# Altium PCB NB3000XN.PcbDoc (part 2 of 71)
Units mil, origin at the board's own origin, x right, y up, seen from the top; angles counter-clockwise.
Board outline 9527.56 x 6929.77 mil, 6 copper layers (Top Layer, GND+SHIELD, MidLayer1, MidLayer2, P2 - 3V3+5V0, Bottom Layer), stack 62.375 mil thick; 832 components, 1027 nets, 4655 pads, 4981 vias.
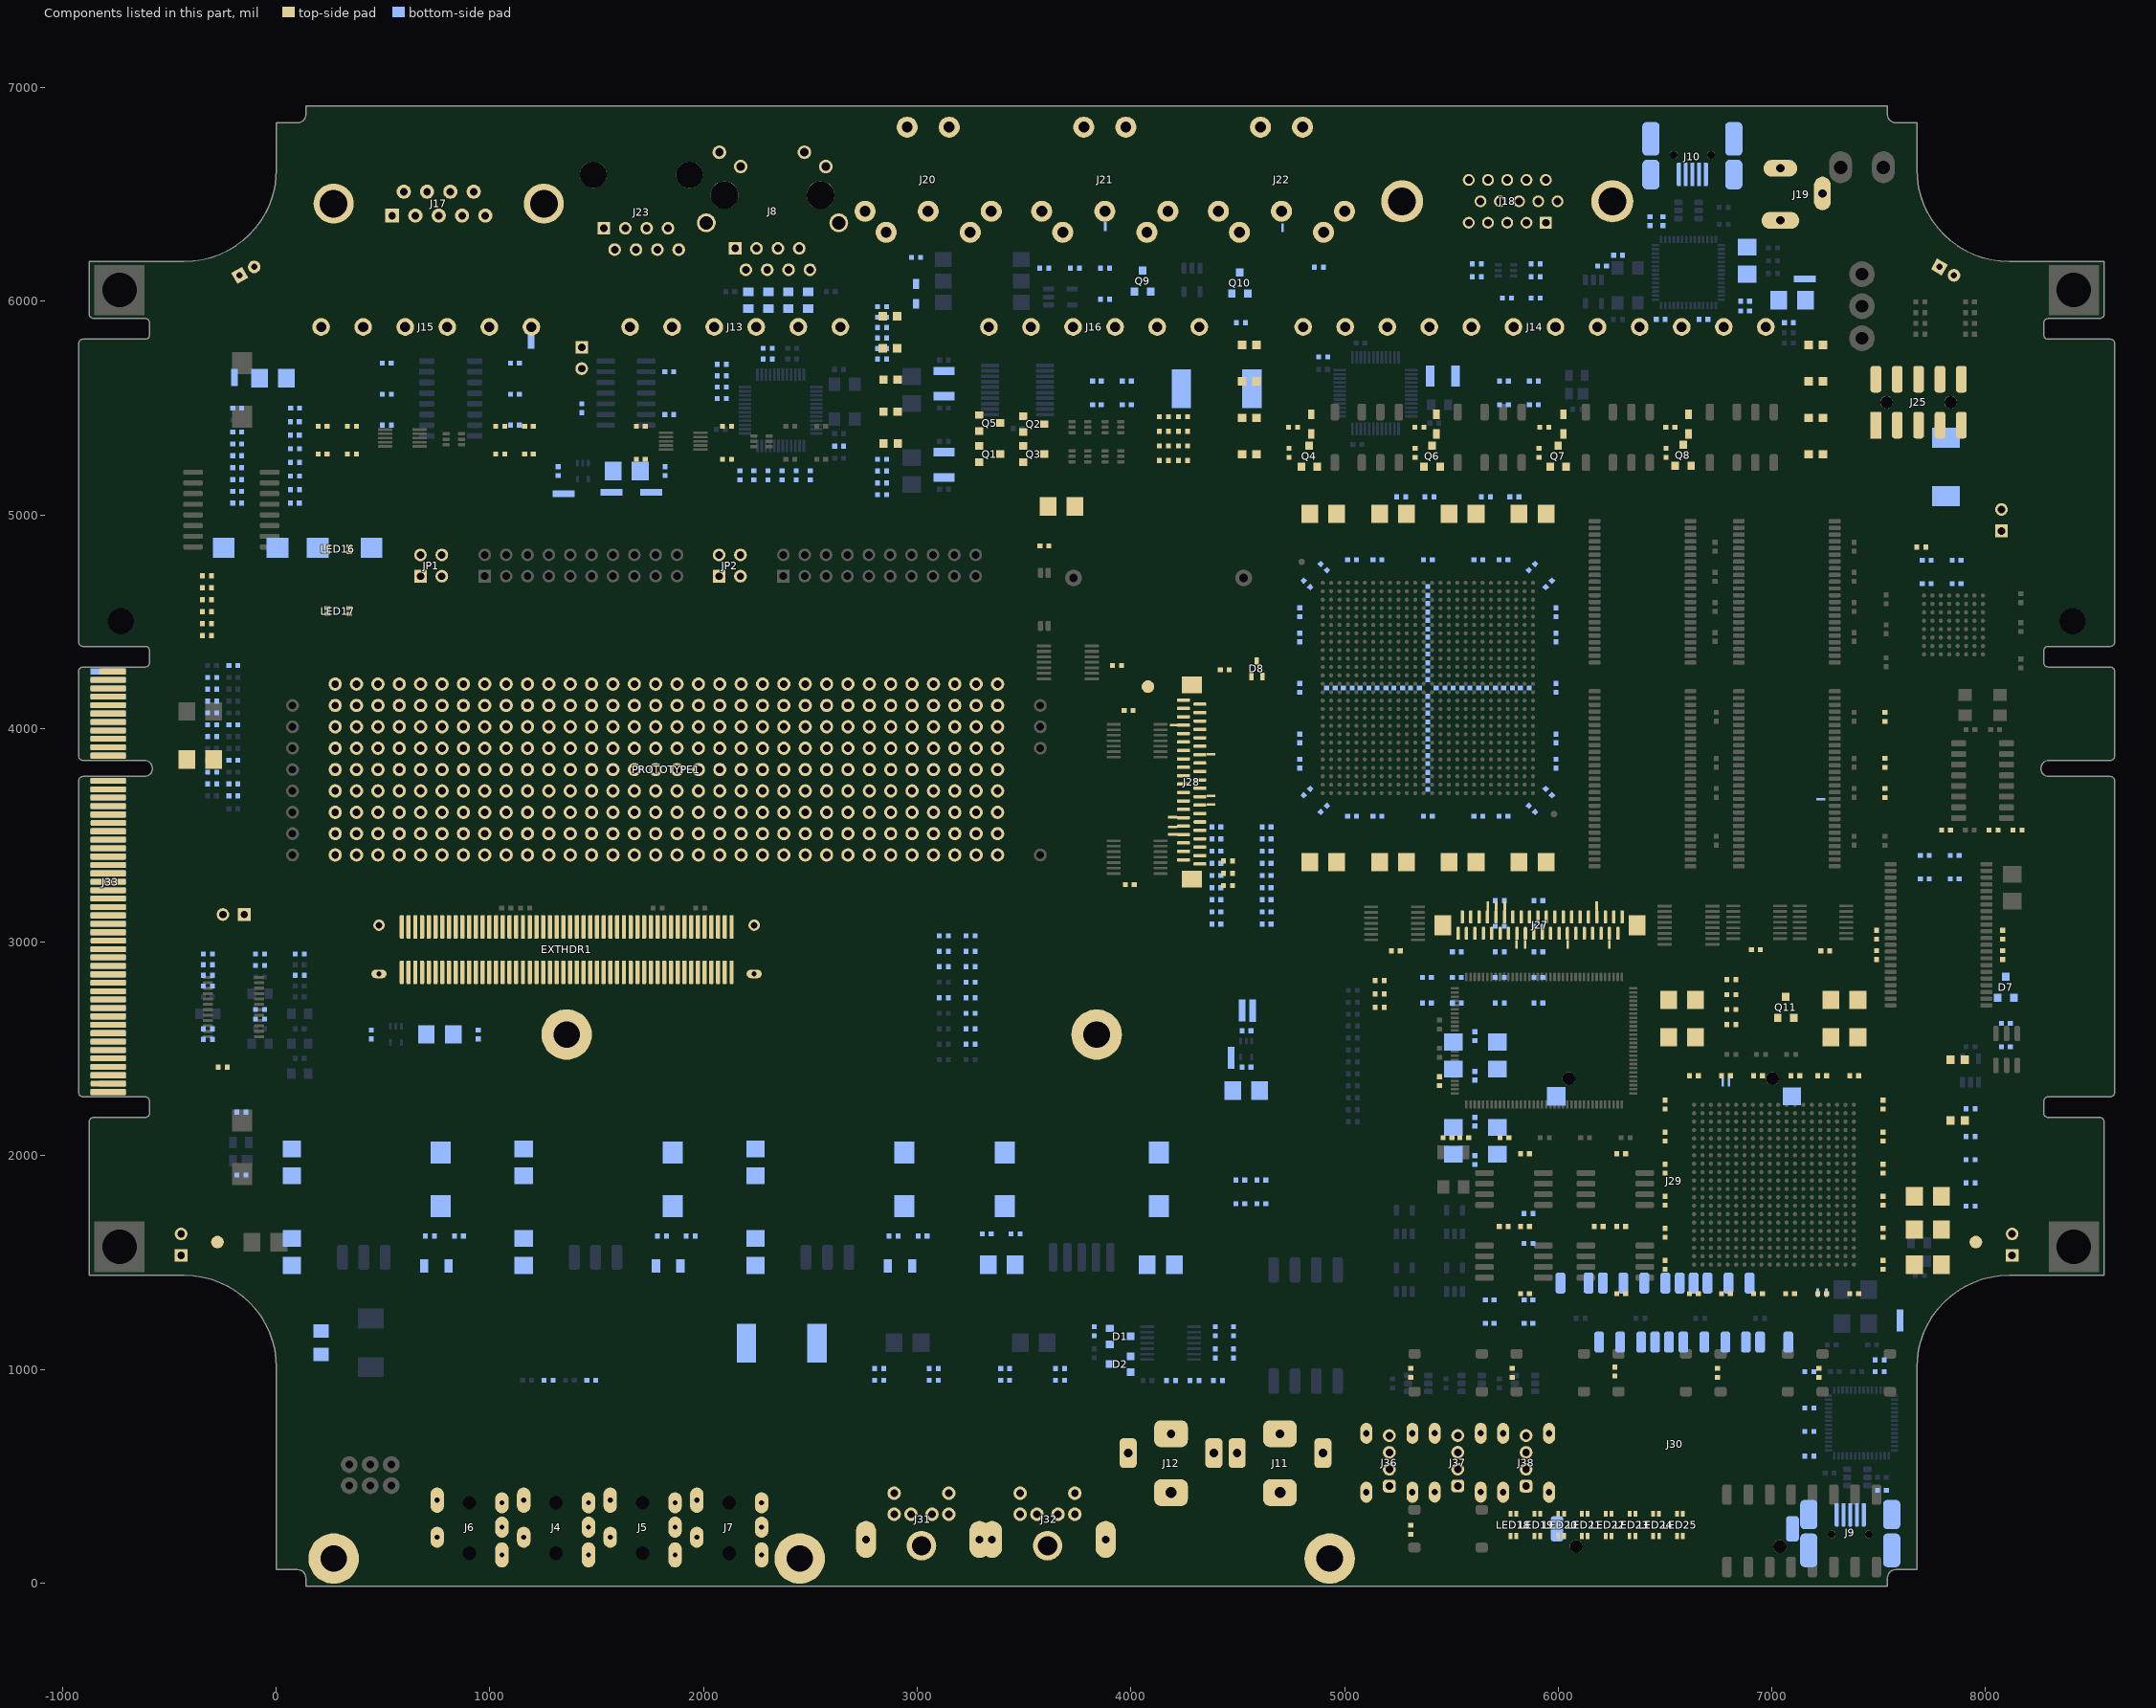
[diagram p6: the components of this part, seen from the top]

## Components (designator, comment, footprint, x,y, rotation, side; value= is the part's Value field where it differs from the comment) (continued)
C106 "220uF 10V" CAPC7343-STAR -120,4845 r180 bottom locked (schematic designator C12)
C107 "220uF 10V" CAPC7343-STAR 320,4845 r180 bottom locked (schematic designator C16)
C108 "1uF 10V" CAPC1005-STAR#1 87.46,5372.94 r180 bottom locked (schematic designator C10)
C109 "1uF 10V" CAPC1005-STAR#1 87.46,5055.08 r0 bottom locked (schematic designator C18)
C110 "1uF 10V" CAPC1005-STAR#1 -182.03,5055.08 r180 bottom locked (schematic designator C14)
C111 "10uF 20V" CAPC3528-STAR#1 -15,5640 r0 bottom locked (schematic designator C23)
C112 "0.1uF 16V" CAPC1005-STAR#1 87.97,5500.08 r180 bottom locked (schematic designator C24)
C113 "0.1uF 16V" CAPC1005-STAR#1 -182.03,5500.08 r180 bottom locked (schematic designator C25)
C114 "0.1uF 16V" CAPC1005-STAR#1 87.46,5436.51 r0 bottom locked (schematic designator C28)
C115 "10uF 20V" CAPC3528-STAR#1 3675,5040 r0 top locked (schematic designator C2)
C116 "0.1uF 16V" CAPC1005-STAR#1 3595,4855 r180 top locked (schematic designator C3)
C117 "33nF 25V" CAPC1005-STAR#1 217,5415 r180 top locked (schematic designator C1)
C118 "33nF 25V" CAPC1005-STAR#1 1183,5415 r0 top locked (schematic designator C2)
C119 "33nF 25V" CAPC1005-STAR#1 1183,5285 r0 top locked (schematic designator C3)
C120 "33nF 25V" CAPC1005-STAR#1 217,5285 r180 top locked (schematic designator C4)
C121 "1uF 10V" CAPC1005-STAR#1 3990,4085 r0 top locked (schematic designator C1)
C122 "1uF 10V" CAPC1005-STAR#1 5240,2960 r0 top locked (schematic designator C1)
C123 "1uF 10V" CAPC1005-STAR#1 6925,2965 r180 top locked (schematic designator C1)
C124 "1uF 10V" CAPC1005-STAR#1 3995,3270 r0 top locked (schematic designator C1)
C125 "1uF 10V" CAPC1005-STAR#1 7250,2960 r0 top locked (schematic designator C1)
C126 "10uF 20V" CAPC3528-STAR#1 2243.07,1550 r90 bottom locked (schematic designator C1)
C127 "1uF 25V" CAPC3216-STAR 2920,1485 r0 bottom locked (schematic designator C2)
C128 "10uF 20V" CAPC3528-STAR#1 2243.07,1970 r90 bottom locked (schematic designator C3)
C129 "220uF 10V" CAPC7343-STAR 2940,1890 r90 bottom locked (schematic designator C4)
C130 "10uF 20V" CAPC3528-STAR#1 1158.07,1550 r90 bottom locked (schematic designator C1)
C131 "1uF 25V" CAPC3216-STAR 1835,1485 r0 bottom locked (schematic designator C2)
C132 "10uF 20V" CAPC3528-STAR#1 1158.07,1970 r90 bottom locked (schematic designator C3)
C133 "220uF 10V" CAPC7343-STAR 1855,1890 r90 bottom locked (schematic designator C4)
C134 "10uF 20V" CAPC3528-STAR#1 73.07,1550 r90 bottom locked (schematic designator C1)
C135 "1uF 25V" CAPC3216-STAR 750,1485 r0 bottom locked (schematic designator C2)
C136 "10uF 20V" CAPC3528-STAR#1 73.07,1970 r90 bottom locked (schematic designator C3)
C137 "220uF 10V" CAPC7343-STAR 770,1890 r90 bottom locked (schematic designator C4)
C138 "220uF 10V" CAPC7343-STAR 4130,1890 r90 bottom locked (schematic designator C1)
C139 "10uF 20V" CAPC3528-STAR#1 4140,1490 r0 bottom locked (schematic designator C2)
C140 "10uF 20V" CAPC3528-STAR#1 3395,1490 r180 bottom locked (schematic designator C3)
C141 "220uF 10V" CAPC7343-STAR 3409.45,1890 r90 bottom locked (schematic designator C4)
C142 "1uF 10V" CAPC1005-STAR#1 4540.98,2585 r180 bottom locked (schematic designator C1)
C143 "10uF 20V" CAPC3528-STAR#1 4540,2305 r0 bottom locked (schematic designator C2)
C144 "1uF 10V" CAPC1005-STAR#1 4540.98,2415 r180 bottom locked (schematic designator C3)
C145 "1uF 10V" CAPC1005-STAR#1 445,2568.37 r270 bottom locked (schematic designator C1)
C146 "10uF 20V" CAPC3528-STAR#2 765.49,2568.37 r180 bottom locked (schematic designator C2)
C147 "1uF 10V" CAPC1005-STAR#1 945,2568.37 r270 bottom locked (schematic designator C3)
C148 "0.1uF 16V" CAPC1005-STAR#1 1117.11,5710.08 r0 bottom locked (schematic designator C1)
C149 "0.1uF 16V" CAPC1005-STAR#1 517.11,5710.08 r0 bottom locked (schematic designator C3)
C150 "0.1uF 16V" CAPC1005-STAR#1 1117.11,5565.08 r0 bottom locked (schematic designator C2)
C151 "0.1uF 16V" CAPC1005-STAR#1 1117.11,5420.08 r0 bottom locked (schematic designator C4)
C152 "1uF 10V" CAPC1005-STAR#1 1840,5470 r0 bottom locked (schematic designator C1)
C153 "0.1uF 16V" CAPC1005-STAR#1 8080,3035 r90 top locked (schematic designator C1_SM)
C154 "0.1uF 16V" CAPC1005-STAR#1 8080,2940 r90 top locked (schematic designator C2_SM)
C155 "10nF 16V" CAPC1005-STAR#1 7490,2940 r90 top locked (schematic designator C3_SM)
C156 "10nF 16V" CAPC1005-STAR#1 7490,3035 r270 top locked (schematic designator C4_SM)
C157 "22pF 50V" CAPC1005-STAR#1 5482,2085 r180 top locked (schematic designator C344)
C158 "10nF 16V" CAPC1005-STAR#1 5745,1670 r0 top locked (schematic designator C1)
C159 "0.1uF 16V" CAPC1005-STAR#1 5845,2010 r180 top locked (schematic designator C2)
C160 "10nF 16V" CAPC1005-STAR#1 6190,1670 r180 top locked (schematic designator C1)
C161 "0.1uF 16V" CAPC1005-STAR#1 6295,1355 r0 top locked (schematic designator C2)
C162 "10nF 16V" CAPC1005-STAR#1 6295,2010 r180 top locked (schematic designator C1)
C163 "0.1uF 16V" CAPC1005-STAR#1 6295,1670 r180 top locked (schematic designator C2)
C164 "10nF 16V" CAPC1005-STAR#1 5845,1670 r180 top locked (schematic designator C3)
C165 "0.1uF 16V" CAPC1005-STAR#1 5845,1355 r180 top locked (schematic designator C4)
C166 "22pF 50V" CAPC1005-STAR#1 6430,6375 r90 bottom locked (schematic designator C1)
C167 "22pF 50V" CAPC1005-STAR#1 6490,6375 r90 bottom locked (schematic designator C2)
C168 "0.1uF 16V" CAPC1005-STAR#1 6280,6215 r180 bottom locked (schematic designator C3)
C169 "22pF 50V" CAPC1005-STAR#1 5560,2085 r180 top locked (schematic designator C345)
C170 "0.1uF 16V" CAPC1005-STAR#1 7080,5900 r180 bottom locked (schematic designator C2)
C171 "10uF 20V" CAPC3528-STAR#1 7095,6005 r0 bottom locked (schematic designator C6)
C172 "0.1uF 16V" CAPC1005-STAR#1 6205,6165 r180 bottom locked (schematic designator C3)
C173 "0.1uF 16V" CAPC1005-STAR#1 6680,5915 r0 bottom locked (schematic designator C4)
C174 "0.1uF 16V" CAPC1005-STAR#1 6480,5915 r180 bottom locked (schematic designator C5)
C175 "10uF 20V" CAPC3528-STAR#1 6885,6190 r90 bottom locked (schematic designator C7)
C176 "0.1uF 16V" CAPC1005-STAR#1 6875,5955 r180 bottom locked (schematic designator C8)
C177 "0.1uF 16V" CAPC1005-STAR#1 6875,6000 r180 bottom locked (schematic designator C9)
C181 "1uF 10V" CAPC1005-STAR#1 1320,5205 r270 bottom locked (schematic designator C1)
C182 "10uF 20V" CAPC3528-STAR#1 1640.49,5205 r180 bottom locked (schematic designator C2)
C183 "1uF 10V" CAPC1005-STAR#1 1820,5205 r270 bottom locked (schematic designator C3)
C184 "10uF 20V" CAPC3528-STAR#1 7340,2730 r0 top locked (schematic designator C42_FP)
C185 "10uF 20V" CAPC3528-STAR#1 5715,2070 r270 bottom locked (schematic designator C343)
C186 "220nF 16V" CAPC1005-STAR#1 5445,2350 r270 top locked (schematic designator C205)
C187 "0.1uF 16V" CAPC1005-STAR#1 5748.74,2085 r0 top locked (schematic designator C204)
C189 "10uF 20V" CAPC3528-STAR#1 6580,2730 r180 top locked (schematic designator C1_FP)
C190 "10uF 20V" CAPC3528-STAR#1 7730,1810 r0 top locked (schematic designator C2_FP)
C191 "10uF 20V" CAPC3528-STAR#1 -355,3855 r180 top locked (schematic designator C3_FP)
C192 "0.1uF 16V" CAPC1005-STAR#1 5386.06,2715 r0 bottom locked (schematic designator C5_FP)
C193 "0.1uF 16V" CAPC1005-STAR#1 5386.06,2835 r0 bottom locked (schematic designator C8_FP)
C194 "0.1uF 16V" CAPC1005-STAR#1 7520,1940 r90 top locked (schematic designator C9_FP)
C195 "0.1uF 16V" CAPC1005-STAR#1 7520,1790 r270 top locked (schematic designator C11_FP)
C196 "10nF 16V" CAPC1005-STAR#1 6935,2375 r180 top locked (schematic designator C13_FP)
C197 "10nF 16V" CAPC1005-STAR#1 7110,2375 r0 top locked (schematic designator C15_FP)
C198 "10nF 16V" CAPC1005-STAR#1 6935,1355 r180 top locked (schematic designator C16_FP)
C199 "10nF 16V" CAPC1005-STAR#1 7085,1355 r0 top locked (schematic designator C18_FP)
C200 "10uF 20V" CAPC3528-STAR#1 7730,1655 r0 top locked (schematic designator C38_FP)
C201 "10uF 20V" CAPC3528-STAR#1 7340,2555 r0 top locked (schematic designator C39_FP)
C202 "10uF 20V" CAPC3528-STAR#1 6580,2555 r180 top locked (schematic designator C40_FP)
C203 "10uF 20V" CAPC3528-STAR#1 7730,1490 r0 top locked (schematic designator C41_FP)
C215 "0.1uF 16V" CAPC1005-STAR#1 6635,2375 r0 top locked (schematic designator C46_FP)
C216 "0.1uF 16V" CAPC1005-STAR#1 4512.39,1776.18 r180 bottom locked (schematic designator C47_FP)
C217 "0.1uF 16V" CAPC1005-STAR#1 7235,2375 r0 top locked (schematic designator C48_FP)
C218 "0.1uF 16V" CAPC1005-STAR#1 7520,2240 r90 top locked (schematic designator C49_FP)
C219 "0.1uF 16V" CAPC1005-STAR#1 5679.72,1326.18 r0 bottom locked (schematic designator C50_FP)
C220 "0.1uF 16V" CAPC1005-STAR#1 7520,1640 r90 top locked (schematic designator C51_FP)
C221 "0.1uF 16V" CAPC1005-STAR#1 6635,1355 r0 top locked (schematic designator C52_FP)
C222 "0.1uF 16V" CAPC1005-STAR#1 7716.06,3296.18 r180 bottom locked (schematic designator C53_FP)
C223 "0.1uF 16V" CAPC1005-STAR#1 7235,1355 r0 top locked (schematic designator C54_FP)
C224 "0.1uF 16V" CAPC1005-STAR#1 6500,2240 r90 top locked (schematic designator C55_FP)
C225 "0.1uF 16V" CAPC1005-STAR#1 5886.06,5626.18 r180 bottom locked (schematic designator C56_FP)
C226 "0.1uF 16V" CAPC1005-STAR#1 5886.06,5516.18 r180 bottom locked (schematic designator C57_FP)
C227 "0.1uF 16V" CAPC1005-STAR#1 7724.33,4788 r180 bottom locked (schematic designator C58_FP)
C228 "0.1uF 16V" CAPC1005-STAR#1 7724.33,4678 r180 bottom locked (schematic designator C59_FP)
C229 "0.1uF 16V" CAPC1005-STAR#1 3981.06,5626.18 r180 bottom locked (schematic designator C60_FP)
C231 "10nF 16V" CAPC1005-STAR#1 6785,2375 r0 top locked (schematic designator C62_FP)
C232 "10nF 16V" CAPC1005-STAR#1 4512.39,1886.18 r180 bottom locked (schematic designator C63_FP)
C233 "10nF 16V" CAPC1005-STAR#1 7385,2375 r0 top locked (schematic designator C64_FP)
C234 "10nF 16V" CAPC1005-STAR#1 7520,2090 r90 top locked (schematic designator C65_FP)
C235 "10nF 16V" CAPC1005-STAR#1 5679.72,1216.18 r0 bottom locked (schematic designator C66_FP)
C236 "10nF 16V" CAPC1005-STAR#1 7520,1490 r90 top locked (schematic designator C67_FP)
C237 "10nF 16V" CAPC1005-STAR#1 6785,1355 r0 top locked (schematic designator C68_FP)
C238 "10nF 16V" CAPC1005-STAR#1 7716.06,3406.18 r180 bottom locked (schematic designator C69_FP)
C239 "10nF 16V" CAPC1005-STAR#1 7385,1355 r0 top locked (schematic designator C70_FP)
C240 "10nF 16V" CAPC1005-STAR#1 6500,2090 r90 top locked (schematic designator C71_FP)
C241 "10nF 16V" CAPC1005-STAR#1 6500,1790 r90 top locked (schematic designator C73_FP)
C242 "10nF 16V" CAPC1005-STAR#1 6500,1490 r90 top locked (schematic designator C74_FP)
C243 "10nF 16V" CAPC1005-STAR#1 3841.06,5626.18 r0 bottom locked (schematic designator C79_FP)
C244 "10nF 16V" CAPC1005-STAR#1 3841.06,5516.18 r0 bottom locked (schematic designator C80_FP)
C245 "10nF 16V" CAPC1005-STAR#1 6500,1940 r90 top locked (schematic designator C81_FP)
C246 "10nF 16V" CAPC1005-STAR#1 6500,1640 r90 top locked (schematic designator C84_FP)
C247 "0.1uF 16V" CAPC1005-STAR#1 7864.33,4788 r0 bottom locked (schematic designator C85_FP)
C248 "10nF 16V" CAPC1005-STAR#1 7864.33,4678 r180 bottom locked (schematic designator C101_FP)
C249 "0.1uF 16V" CAPC1005-STAR#1 5861.06,1326.18 r180 bottom locked (schematic designator C87_FP)
C250 "10nF 16V" CAPC1005-STAR#1 5861.06,1216.18 r180 bottom locked (schematic designator C88_FP)
C251 "10nF 16V" CAPC1005-STAR#1 4611.06,1886.18 r180 bottom locked (schematic designator C89_FP)
C252 "0.1uF 16V" CAPC1005-STAR#1 4611.06,1776.18 r180 bottom locked (schematic designator C100_FP)
C253 "10nF 16V" CAPC1005-STAR#1 7856.06,3406.18 r180 bottom locked (schematic designator C91_FP)
C254 "10nF 16V" CAPC1005-STAR#1 7856.06,3296.18 r180 bottom locked (schematic designator C99_FP)
C255 "0.1uF 16V" CAPC1005-STAR#1 5746.06,5626.18 r180 bottom locked (schematic designator C98_FP)
C256 "10nF 16V" CAPC1005-STAR#1 5746.06,5516.18 r180 bottom locked (schematic designator C94_FP)
C257 "0.1uF 16V" CAPC1005-STAR#1 5526.06,2835 r180 bottom (schematic designator C95_FP)
C258 "10nF 16V" CAPC1005-STAR#1 5526.06,2715 r180 bottom locked (schematic designator C96_FP)
C259 "0.1uF 16V" CAPC1005-STAR#1 3981.06,5516.18 r180 bottom locked (schematic designator C97_FP)
C260 "10uF 20V" CAPC3528-STAR#1 5227.32,5005 r180 top locked (schematic designator C42_FP)
C265 "10uF 20V" CAPC3528-STAR#1 5227.32,3375 r180 top locked (schematic designator C1_FP)
C266 "10uF 20V" CAPC3528-STAR#1 5552.68,3375 r0 top locked (schematic designator C2_FP)
C267 "10uF 20V" CAPC3528-STAR#1 5552.68,5005 r0 top locked (schematic designator C3_FP)
C268 "0.1uF 16V" CAPC1005-STAR#2 5390,4250.04 r90 bottom locked (schematic designator C5_FP)
C269 "0.1uF 16V" CAPC1005-STAR#2 5450.04,4190 r0 bottom locked (schematic designator C8_FP)
C270 "0.1uF 16V" CAPC1005-STAR#2 5390,4129.96 r270 bottom locked (schematic designator C9_FP)
C271 "0.1uF 16V" CAPC1005-STAR#2 5329.96,4190 r180 bottom locked (schematic designator C11_FP)
C272 "10nF 16V" CAPC1005-STAR#2 5390,4328.78 r90 bottom locked (schematic designator C13_FP)
C273 "10nF 16V" CAPC1005-STAR#2 5528.78,4190 r0 bottom locked (schematic designator C15_FP)
C274 "10nF 16V" CAPC1005-STAR#2 5390,4051.22 r270 bottom locked (schematic designator C16_FP)
C275 "10nF 16V" CAPC1005-STAR#2 5251.22,4190 r180 bottom locked (schematic designator C18_FP)
C276 "10uF 20V" CAPC3528-STAR#1 4900,5005 r180 top locked (schematic designator C38_FP)
C277 "10uF 20V" CAPC3528-STAR#1 5880,5005 r0 top locked (schematic designator C39_FP)
C278 "10uF 20V" CAPC3528-STAR#1 4900,3375 r180 top locked (schematic designator C40_FP)
C279 "10uF 20V" CAPC3528-STAR#1 5880,3375 r0 top locked (schematic designator C41_FP)
C291 "0.1uF 16V" CAPC1005-STAR#2 5626.22,4790 r180 bottom locked (schematic designator C46_FP)
C292 "0.1uF 16V" CAPC1005-STAR#2 5153.78,4790 r0 bottom locked (schematic designator C47_FP)
C293 "0.1uF 16V" CAPC1005-STAR#2 5877.06,4755.8 r45 bottom locked (schematic designator C48_FP)
C294 "0.1uF 16V" CAPC1005-STAR#2 4902.94,4755.8 r135 bottom locked (schematic designator C49_FP)
C295 "0.1uF 16V" CAPC1005-STAR#2 5390,4407.52 r90 bottom locked (schematic designator C50_FP)
C296 "0.1uF 16V" CAPC1005-STAR#2 5607.52,4190 r0 bottom locked (schematic designator C51_FP)
C297 "0.1uF 16V" CAPC1005-STAR#2 5390,3972.48 r270 bottom locked (schematic designator C52_FP)
C298 "0.1uF 16V" CAPC1005-STAR#2 5172.48,4190 r180 bottom locked (schematic designator C53_FP)
C299 "0.1uF 16V" CAPC1005-STAR#2 5390,4565 r90 bottom locked (schematic designator C54_FP)
C300 "0.1uF 16V" CAPC1005-STAR#2 5765,4190 r0 bottom locked (schematic designator C55_FP)
C301 "0.1uF 16V" CAPC1005-STAR#2 5390,3815 r270 bottom locked (schematic designator C56_FP)
C302 "0.1uF 16V" CAPC1005-STAR#2 5015,4190 r180 bottom locked (schematic designator C57_FP)
C303 "0.1uF 16V" CAPC1005-STAR#2 5990,4544.33 r90 bottom locked (schematic designator C58_FP)
C304 "0.1uF 16V" CAPC1005-STAR#2 4790,4544.33 r90 bottom locked (schematic designator C59_FP)
C305 "0.1uF 16V" CAPC1005-STAR#2 5990,3953.78 r90 bottom locked (schematic designator C60_FP)
C307 "10nF 16V" CAPC1005-STAR#2 5744.33,4790 r180 bottom locked (schematic designator C62_FP)
C308 "10nF 16V" CAPC1005-STAR#2 5035.67,4790 r0 bottom locked (schematic designator C63_FP)
C309 "10nF 16V" CAPC1005-STAR#2 5955.8,4677.06 r45 bottom locked (schematic designator C64_FP)
C310 "10nF 16V" CAPC1005-STAR#2 4824.2,4677.06 r135 bottom locked (schematic designator C65_FP)
C311 "10nF 16V" CAPC1005-STAR#2 5390,4486.26 r270 bottom locked (schematic designator C66_FP)
C312 "10nF 16V" CAPC1005-STAR#2 5686.26,4190 r180 bottom locked (schematic designator C67_FP)
C313 "10nF 16V" CAPC1005-STAR#2 5390,3893.74 r90 bottom locked (schematic designator C68_FP)
C314 "10nF 16V" CAPC1005-STAR#2 5093.74,4190 r0 bottom locked (schematic designator C69_FP)
C315 "10nF 16V" CAPC1005-STAR#2 5390,4643.74 r270 bottom locked (schematic designator C70_FP)
C316 "10nF 16V" CAPC1005-STAR#2 5843.74,4190 r180 bottom locked (schematic designator C71_FP)
C317 "10nF 16V" CAPC1005-STAR#2 5390,3736.26 r90 bottom locked (schematic designator C73_FP)
C318 "10nF 16V" CAPC1005-STAR#2 4936.26,4190 r0 bottom locked (schematic designator C74_FP)
C319 "10nF 16V" CAPC1005-STAR#2 5990,4426.22 r90 bottom locked (schematic designator C79_FP)
C320 "10nF 16V" CAPC1005-STAR#2 4790,4426.22 r270 bottom locked (schematic designator C80_FP)
C321 "10nF 16V" CAPC1005-STAR#2 5990,3835.67 r270 bottom locked (schematic designator C81_FP)
C322 "10nF 16V" CAPC1005-STAR#2 4790,3835.67 r270 bottom locked (schematic designator C84_FP)
C323 "0.1uF 16V" CAPC1005-STAR#2 4790,3953.78 r90 bottom locked (schematic designator C85_FP)
C324 "10nF 16V" CAPC1005-STAR#2 5877.06,3624.2 r315 bottom locked (schematic designator C101_FP)
C325 "0.1uF 16V" CAPC1005-STAR#2 5955.8,3702.94 r315 bottom locked (schematic designator C87_FP)
C326 "10nF 16V" CAPC1005-STAR#2 4902.94,3624.2 r225 bottom locked (schematic designator C88_FP)
C327 "10nF 16V" CAPC1005-STAR#2 4824.2,3702.94 r225 bottom locked (schematic designator C89_FP)
C328 "0.1uF 16V" CAPC1005-STAR#2 5626.22,3590 r180 bottom locked (schematic designator C100_FP)
C329 "10nF 16V" CAPC1005-STAR#2 5744.33,3590 r180 bottom locked (schematic designator C91_FP)
C330 "10nF 16V" CAPC1005-STAR#2 5153.78,3590 r0 bottom locked (schematic designator C99_FP)
C331 "0.1uF 16V" CAPC1005-STAR#2 5035.67,3590 r0 bottom locked (schematic designator C98_FP)
C332 "10nF 16V" CAPC1005-STAR#2 5390,4790 r0 bottom locked (schematic designator C94_FP)
C333 "0.1uF 16V" CAPC1005-STAR#2 5390,3590 r180 bottom locked (schematic designator C95_FP)
C334 "10nF 16V" CAPC1005-STAR#2 5990,4190 r90 bottom locked (schematic designator C96_FP)
C335 "0.1uF 16V" CAPC1005-STAR#2 4790,4190 r270 bottom locked (schematic designator C97_FP)
C336 "0.1uF 16V" CAPC1005-STAR#1 5610,2560 r90 bottom locked (schematic designator C3)
C337 "0.1uF 16V" CAPC1005-STAR#1 5610,2375 r90 bottom locked (schematic designator C4)
C338 "0.1uF 16V" CAPC1005-STAR#1 5610,2160 r90 bottom locked (schematic designator C5)
C339 "0.1uF 16V" CAPC1005-STAR#1 5610,1980 r90 bottom locked (schematic designator C6)
C340 "10uF 20V" CAPC3528-STAR#1 5510,2470 r270 bottom locked (schematic designator C7)
C341 "10uF 20V" CAPC3528-STAR#1 5510,2070 r270 bottom locked (schematic designator C8)
C342 "10uF 20V" CAPC3528-STAR#1 5715,2470 r270 bottom locked (schematic designator C9)
D1 "200mA 30V" SOT95P230-3C 3950,1155 r90 bottom locked
D2 "200mA 30V" SOT95P230-3C 3950,1025 r270 bottom locked
D3 "ZHCS400" SOD323 4845,5425 r90 top locked (schematic designator D1)
D4 "ZHCS400" SOD323 5430,5425 r90 top locked (schematic designator D1)
D5 "ZHCS400" SOD323 6025,5425 r90 top locked (schematic designator D1)
D6 "ZHCS400" SOD323 6610,5425 r90 top locked (schematic designator D1)
D7 "3.3V" SOT95P230-3D 8095,2789 r180 bottom locked (schematic designator D1)
D8 "BAT54CW-3" SOT323-3AL 4590,4280 r90 top locked (schematic designator D1)
D9 "ZHCS400" SOD323 2995,6035 r270 bottom locked (schematic designator D1)
D10 "5V 5W" DIOM8059 7814.9,5225 r90 bottom locked
EXTHDR1 "NANOCONNECT" 53751 1359.67,2965.55 r180 top locked (schematic designator EXTHDR)
F1 "MF-SM250" MF_SM250 4475,5585 r180 bottom locked
F2 "MF-SM250" MF_SM250 2440,1118.58 r180 bottom locked
FD1 "Fiducial - Round" "FIDUCIAL ROUND" -274.99,1596.61 r90 top locked
FD2 "Fiducial - Round" "FIDUCIAL ROUND" 4080,4196.25 r90 top locked
FD3 "Fiducial - Round" "FIDUCIAL ROUND" 7955,1596.61 r90 top locked
J1 "1x2 HEADER MALE" HDR1X2 -445,1535 r90 top locked
J2 "1x2 HEADER MALE" HDR1X2 -150,3130 r180 top locked
J3 "1x2 HEADER MALE" HDR1X2 8125,1535 r90 top locked
J4 "AUDIO BLACK HEADER" TSH-3675 1310,140 r90 bottom locked (schematic designator J1)
J5 "AUDIO GREEN HEADER" TSH-3675 1715,140 r90 bottom locked (schematic designator J3)
J6 "AUDIO BLUE HEADER" TSH-3675 905,140 r90 bottom locked (schematic designator J4)
J7 "AUDIO BLACK HEADER" TSH-3675 2120,140 r90 bottom locked (schematic designator J5)
J8 "RJ45_LEDS" CON_RJ45_RA_LEDS 2323,6497.49 r0 bottom locked (schematic designator J1)
J9 "USB MINI" KME04-USBMU03A01-1 7430,320 r90 bottom locked (schematic designator J1)
J10 "USB MINI" KME04-USBMU03A01-1 6565,6594 r270 bottom locked (schematic designator J1)
J11 "RCA Header" TRC-005 4697.98,699.39 r90 bottom locked (schematic designator J1)
J12 "RCA Header" TRC-005 4187.98,699.39 r90 bottom locked (schematic designator J2)
J13 "KMRJ103-5.0/508 6WAYS" KMRJ103-5-508-6 2148.35,5880 r0 top locked (schematic designator J1)
J14 "KMRJ103-5.0/508 12WAYS" KMRJ103-5-508-12 5889.2,5880 r0 top locked (schematic designator J4)
J15 "KMRJ103-5.0/508 6WAYS" KMRJ103-5-508-6 702.26,5880 r0 top locked (schematic designator J2)
J16 "KMRJ103-5.0/508 6WAYS" KMRJ103-5-508-6 3828.04,5880.01 r0 top locked (schematic designator J3)
J17 "DRB-09P11G1R" DB9_MALE 597,6513 r180 bottom locked (schematic designator J1)
J18 "HDR-15S11G1R" DB15-VGA-FEMALE 5942,6368 r180 bottom locked (schematic designator J1)
J19 "POWERJACK 3 HEADER" KLD-0202 7040,6918 r270 bottom locked (schematic designator J1)
J20 "KMFCDIN76005" KMFCDIN76005 3051.46,6569 r0 bottom locked (schematic designator J1)
J21 "KMFCDIN76005" KMFCDIN76005 3878.23,6569 r0 bottom locked (schematic designator J2)
J22 "KMFCDIN76005" KMFCDIN76005 4705,6569 r0 bottom locked (schematic designator J3)
J23 "955012881" 955012881 1709,6477 r0 bottom locked (schematic designator J1)
J24 "1x2 HEADER MALE" HDR1X2 8075,4925.76 r90 top locked (schematic designator J1)
J25 "TSM-105-01-S-DV" TSM-105-01-DV 7486.99,5635.25 r0 top locked (schematic designator J1)
J26 "1x2 HEADER MALE" HDR1X2 1429.42,5784.24 r270 top locked (schematic designator J1)
J27 "2x20 FFC VERT" FPC-XXS1VN3R 5915.42,3080 r180 top locked
J28 "2x20 FFC VERT" FPC-XXS1VN3R 4285,3750 r270 top locked (schematic designator J1)
J29 "SD CARD HEADER" KSDC012551#1 6542.3,1883 r180 bottom locked (schematic designator J1)
J30 "SD CARD HEADER" KSDC012551#2 6545.55,650 r0 bottom locked (schematic designator J1)
J31 "MINIDIN 6P" MINIDIN6PURPLE 3020,-10 r90 bottom locked (schematic designator J1)
J32 "MINIDIN 6P" MINIDIN6PURPLE 3610,-10 r90 bottom locked (schematic designator J1)
J33 "Diagnostics Interface" EDGE-PCIE-X8 -923.78,4267.03 r90 top locked (schematic designator J1)
J34 "1x2 PH" PH-2 -171.19,6121.57 r30 bottom (schematic designator J37)
J35 "1x2 PH" PH-2 7784.36,6160.94 r330 bottom (schematic designator J38)
J36 "USB A UPRIGHT" 482040001 5209.9,150 r180 bottom locked (schematic designator J34)
J37 "USB A UPRIGHT" 482040001 5529.9,150.39 r180 bottom locked (schematic designator J34)
J38 "USB A UPRIGHT" 482040001 5849.9,150 r180 bottom locked (schematic designator J34)
JP1 "2x2 HEADER MALE" HDR2X2 675.1,4713.08 r0 top locked
JP2 "2x2 HEADER MALE" HDR2X2 2072.74,4713.08 r0 top locked
L1 "22uH 250mA 0.71R" INDC3225 3125,5235 r270 bottom locked
L2 "22uH 250mA 0.71R" INDC3225 3125,5615 r270 bottom locked
L3 "4.7uH 650mA 0.15R" INDC3225 5460,5650 r180 bottom locked (schematic designator L1)
LED1 "LED, Green, 0603 (1608)" 0603LED_GREEN 7870,2450 r180 top locked
LED2 "LED, 0603, Yellow (1608)" 0603LED_YELLOW 7870,2165 r180 top locked
LED3 "LED, Green, 0603 (1608)" 0603LED_GREEN 2872.68,5779.97 r0 top locked
LED4 "LED, Green, 0603 (1608)" 0603LED_GREEN 2872.74,5930 r0 top locked
LED5 "LED, 0603, Yellow (1608)" 0603LED_YELLOW 2875.55,5633.26 r0 top locked (schematic designator LED2)
LED6 "LED, 0603, Orange (1608)" 0603LED_ORANGE 2875.55,5483.47 r0 top locked
LED7 "0603 LED" 0603LED_RED 2875.6,5333.71 r0 top locked (schematic designator LED3)
LED8 "LED, 0603, Yellow (1608)" 0603LED_YELLOW 4553.95,5624.9 r0 top locked (schematic designator LED1)
LED9 "LED, 0603, Yellow (1608)" 0603LED_YELLOW 4553.95,5454.52 r0 top locked (schematic designator LED1)
LED10 "LED, 0603, Yellow (1608)" 0603LED_YELLOW 4553.95,5284.13 r0 top locked (schematic designator LED1)
LED11 "LED, 0603, Orange (1608)" 0603LED_ORANGE 7205.66,5795.28 r0 top locked (schematic designator LED1)
LED12 "LED, 0603, Yellow (1608)" 0603LED_YELLOW 4553.95,5795.29 r0 top locked (schematic designator LED1)
LED13 "LED, 0603, Orange (1608)" 0603LED_ORANGE 7205.66,5624.9 r0 top locked (schematic designator LED1)
LED14 "LED, 0603, Orange (1608)" 0603LED_ORANGE 7205.66,5454.51 r0 top locked (schematic designator LED1)
LED15 "LED, 0603, Orange (1608)" 0603LED_ORANGE 7205.66,5284.12 r0 top locked (schematic designator LED1)
LED16 "S1204RGBSDJC" S1204RGBSDJC 290.31,4840 r180 top locked (schematic designator LED1)
LED17 "S1204RGBSDJC" S1204RGBSDJC 290.31,4550 r180 top locked (schematic designator LED2)
LED18 "S1204RGBSDJC" S1204RGBSDJC 5790.95,272.51 r90 top locked (schematic designator LED1)
LED19 "S1204RGBSDJC" S1204RGBSDJC 5902.2,272.51 r90 top locked (schematic designator LED2)
LED20 "S1204RGBSDJC" S1204RGBSDJC 6013.45,272.51 r90 top locked (schematic designator LED1)
LED21 "S1204RGBSDJC" S1204RGBSDJC 6124.7,272.51 r90 top locked (schematic designator LED2)
LED22 "S1204RGBSDJC" S1204RGBSDJC 6235.94,272.51 r90 top locked (schematic designator LED1)
LED23 "S1204RGBSDJC" S1204RGBSDJC 6347.19,272.51 r90 top locked (schematic designator LED2)
LED24 "S1204RGBSDJC" S1204RGBSDJC 6458.44,272.51 r90 top locked (schematic designator LED1)
LED25 "S1204RGBSDJC" S1204RGBSDJC 6569.68,272.51 r90 top locked (schematic designator LED2)
LOGO1 "Nanoboard Logo" "NANOBOARD LOGO" 720,4460 r180 bottom locked
NT1 "Net Tie SMT2" NETTIE-SMT2-31X39 -195,5690 r90 bottom locked net-tie
NT4 "Net Tie SMT2" NETTIE-SMT2-8X8#1 7254.76,1322.8 r270 bottom locked net-tie (schematic designator NT2)
NT5 "Net Tie SMT2" NETTIE-SMT2-8X8#2 6770,2380 r90 bottom locked net-tie (schematic designator NT3)
NT6 "Net Tie SMT2" NETTIE-SMT2-8X8#3 7215,1322.8 r270 bottom locked net-tie (schematic designator NT4)
NT7 "Net Tie SMT2" NETTIE-SMT2-8X8#4 6801.11,2380 r90 bottom locked net-tie (schematic designator NT5)
NT10 "Net Tie SMT2" NETTIE-SMT2-31X51 7600,1220 r270 bottom locked net-tie (schematic designator NT1)
NT11 "Net Tie SMT2" NETTIE-SMT2-31X39 1194.15,5771.57 r270 bottom locked net-tie
NT17 "Net Tie SMT2" NETTIE-SMT2-31X51 1745,5105 r180 bottom locked net-tie (schematic designator NT2)
NT18 "Net Tie SMT2" NETTIE-SMT2-31X51 1355,5100 r0 bottom locked net-tie (schematic designator NT1)
NT19 "Net Tie SMT2" NETTIE-SMT2-31X51 1560,5105 r180 bottom locked net-tie (schematic designator NT3)
NT26 "Net Tie SMT2" NETTIE-SMT2-8X8#5 4174.92,3582.44 r180 top locked net-tie (schematic designator NT1)
NT27 "Net Tie SMT2" NETTIE-SMT2-8X8#6 4174.92,3543.07 r180 top locked net-tie (schematic designator NT2)
NT28 "Net Tie SMT2" NETTIE-SMT2-8X8#7 4182,4012 r180 top locked net-tie (schematic designator NT3)
NT29 "Net Tie SMT2" NETTIE-SMT2-8X8#8 4333.78,3877.72 r180 top locked net-tie (schematic designator NT4)
NT30 "Net Tie SMT2" NETTIE-SMT2-8X8#9 4396.06,3641.97 r0 top locked net-tie (schematic designator NT5)
NT31 "Net Tie SMT2" NETTIE-SMT2-8X8#10 4174.92,3503.7 r180 top locked net-tie (schematic designator NT6)
NT33 "Net Tie SMT2" NETTIE-SMT2-8X8#11 4396.06,3681.34 r0 top locked net-tie (schematic designator NT8)
NT34 "Net Tie SMT2" NETTIE-SMT2-8X8#12 6240.46,2970 r270 top locked net-tie
NT35 "Net Tie SMT2" NETTIE-SMT2-8X8#13 5747.86,3190 r90 top locked net-tie
NT36 "Net Tie SMT2" NETTIE-SMT2-8X8#14 5708.49,3190 r90 top locked net-tie
NT37 "Net Tie SMT2" NETTIE-SMT2-8X8#15 5846.76,2970 r270 top locked net-tie
NT38 "Net Tie SMT2" NETTIE-SMT2-8X8#16 6043.61,2970 r270 top locked net-tie
NT39 "Net Tie SMT2" NETTIE-SMT2-8X8#17 6180.93,3190 r90 top locked net-tie
NT40 "Net Tie SMT2" NETTIE-SMT2-8X8#18 5669.12,3190 r90 top locked net-tie
NT41 "Net Tie SMT2" NETTIE-SMT2-8X8#19 5807.39,2970 r270 top locked net-tie
NT42 "Net Tie SMT2" NETTIE-SMT2-31X51 4470,2450 r270 bottom locked net-tie (schematic designator NT10)
NT43 "Net Tie SMT2" NETTIE-SMT2-31X51 4520,2690 r90 bottom locked net-tie (schematic designator NT9)
NT44 "Net Tie SMT2" NETTIE-SMT2-31X51 4570,2670 r270 bottom locked net-tie (schematic designator NT11)
NT45 "Net Tie SMT2" NETTIE-SMT2-31X51 7145,6105 r180 bottom locked net-tie (schematic designator NT1)
NT46 "Net Tie SMT2" NETTIE-SMT2-8X8#20 7259,3669 r0 bottom locked net-tie (schematic designator NT3)
NT47 "Net Tie SMT2" NETTIE-SMT2-8X8#20 3880,6380 r90 bottom locked net-tie
NT48 "Net Tie SMT2" NETTIE-SMT2-8X8#21 4710,6365 r90 bottom locked net-tie
PB_MH1 "8.5mm spacer, Gold, 2xM3" STANDOFF_SOLDER_3MM#1 1359.67,2567.91 r180 top locked
PB_MH2 "8.5mm spacer, Gold, 2xM3" STANDOFF_SOLDER_3MM#2 269.12,115.16 r180 top locked
PB_MH3 "8.5mm spacer, Gold, 2xM3" STANDOFF_SOLDER_3MM#2 2450.22,115.16 r270 top locked
PB_MH4 "8.5mm spacer, Gold, 2xM3" STANDOFF_SOLDER_3MM#2 3839.98,2567.91 r180 top locked
PB_MH5 "8.5mm spacer, Gold, 2xM3" STANDOFF_SOLDER_3MM#2 4930.53,115.16 r270 top locked
PBFREE "" LEAD_FREE_S 4035,4895 r180 bottom
PBOARD_A "Comment" PERIPHERAL_BOARD_1SLOT 2580.16,3213.57 r180 top locked
PBOARD_B "Comment" PERIPHERAL_BOARD_1SLOT 5060.46,3213.58 r180 top locked
PCB1 "NB2STR01 Blank PCB" "NB2STR01 Blank PCB" 1379,1235 r180 bottom
PROTOTYPE1 "" TESTPOINT_ARRAY 276.12,3408.23 r0 top locked (schematic designator PROTOTYPE)
Q1 "AO3400" SOT95P230-3D 3340,5285 r270 top locked
Q2 "AO3400" SOT95P230-3D 3545,5425 r270 top locked (schematic designator Q1)
Q3 "AO3400" SOT95P230-3D 3545,5285 r270 top locked (schematic designator Q1)
Q4 "2N7002" SOT95P230-3D 4835,5275 r0 top locked (schematic designator Q1)
Q5 "AO3400" SOT95P230-3D 3340,5430 r270 top locked (schematic designator Q1)
Q6 "2N7002" SOT95P230-3D 5410,5275 r0 top locked (schematic designator Q1)
Q7 "2N7002" SOT95P230-3D 6000,5275 r0 top locked (schematic designator Q1)
Q8 "2N7002" SOT95P230-3D 6585,5280 r0 top locked (schematic designator Q1)
Q9 "2N7002" SOT95P230-3D 4055,6095 r180 bottom locked (schematic designator Q1)
Q10 "2N7002" SOT95P230-3D 4510,6085 r180 bottom locked (schematic designator Q1)
Q11 "AO3400" SOT95P230-3D 7065,2695 r0 top locked
R1 "3K3 1%" RESC1005-STAR -200,3851.36 r180 bottom locked
R2 "10K 1%" RESC1005-STAR -300,3795.91 r0 bottom locked
R3 "47K 1%" RESC1005-STAR 1475,950 r180 bottom locked (schematic designator R14)
R4 "47K 1%" RESC1005-STAR 1275.01,950 r180 bottom locked (schematic designator R15)
R5 "10K 1%" RESC1005-STAR -300,3740.45 r0 bottom locked (schematic designator R3)
R6 "10K 1%" RESC1005-STAR -200,3740.45 r180 bottom locked (schematic designator R4)
R7 "10K 1%" RESC1005-STAR -200,3685 r180 bottom locked (schematic designator R5)
R8 "22K 1%" RESC1005-STAR -300,3962.27 r180 bottom locked (schematic designator R6)
R9 "100K 1%" RESC1005-STAR -200,4017.73 r180 bottom locked (schematic designator R7)
R10 "10K 1%" RESC1005-STAR -300,4017.73 r180 bottom locked (schematic designator R8)
R11 "10K 1%" RESC1005-STAR -300,4073.18 r180 bottom locked (schematic designator R9)
R12 "10K 1%" RESC1005-STAR -300,4128.64 r180 bottom locked (schematic designator R10)
R13 "10K 1%" RESC1005-STAR -300,4184.09 r180 bottom locked (schematic designator R11)
R14 "3K3 1%" RESC1005-STAR -200,4295 r180 bottom locked (schematic designator R12)
R15 "10K 1%" RESC1005-STAR -300,4239.55 r180 bottom locked (schematic designator R13)
R16 "33R 1%" RESC1005-STAR -320,2795 r180 bottom locked (schematic designator R1)
R17 "33R 1%" RESC1005-STAR -320,2845 r180 bottom locked (schematic designator R2)
R18 "33R 1%" RESC1005-STAR -320,2945 r0 bottom locked (schematic designator R3)
R19 "33R 1%" RESC1005-STAR -320,2545 r180 bottom locked (schematic designator R4)
R20 "33R 1%" RESC1005-STAR -320,2895 r0 bottom locked (schematic designator R5)
R21 "10K 1%" RESC1005-STAR -320,2595 r0 bottom locked (schematic designator R6)
R22 "4K7 1%" RESC1005-STAR -75,2640 r180 bottom locked (schematic designator R7)
R23 "430R 1%" RESC1005-STAR 110,2845 r180 bottom locked (schematic designator R8)
R24 "430R 1%" RESC1005-STAR 110,2945 r180 bottom locked (schematic designator R9)
R25 "4K7 1%" RESC1005-STAR -75,2685 r180 bottom locked (schematic designator R10)
R26 "4K7 1%" RESC1005-STAR -75,2891.25 r180 bottom locked (schematic designator R11)
R27 "4K7 1%" RESC1005-STAR -75,2945 r180 bottom locked (schematic designator R12)
R28 "5R6 1%" RESC1005-STAR 8150,3525 r0 top locked (schematic designator R1)
R29 "5R6 1%" RESC1005-STAR 7815,3525 r180 top locked (schematic designator R2)
R30 "1K 1%" RESC1005-STAR 8038.33,3525 r180 top locked (schematic designator R3)
R31 "120R 1%" RESC1005-STAR 4480,1180 r270 bottom locked (schematic designator R1)
R32 "120R 1%" RESC1005-STAR 4480,1075 r270 bottom locked (schematic designator R2)
R33 "33R 1%" RESC1005-STAR 4407,949 r0 bottom (schematic designator R3)
R34 "75R 1%" RESC1005-STAR 4297.34,949 r180 bottom (schematic designator R4)
R35 "10K 1%" RESC1005-STAR 4395,1180 r270 bottom locked (schematic designator R6)
R36 "75R 1%" RESC1005-STAR 3829,1180 r90 bottom locked (schematic designator R8)
R37 "100R 1%" RESC1005-STAR 4187.68,949 r180 bottom (schematic designator R7)
R38 "10K 1%" RESC1005-STAR 4395,1075 r90 bottom (schematic designator R5)
R39 "270R 1%" RESC1005-STAR 7930,2220 r0 bottom locked (schematic designator R1)
R40 "270R 1%" RESC1005-STAR 7930,2090 r0 bottom locked (schematic designator R2)
R41 "4K7 1%" RESC1005-STAR 2434,5185 r270 bottom locked (schematic designator R1)
R42 "4K7 1%" RESC1005-STAR 2368,5185 r270 bottom locked (schematic designator R2)
R43 "4K7 1%" RESC1005-STAR 2302,5185 r270 bottom locked (schematic designator R3)
R44 "4K7 1%" RESC1005-STAR 2236,5185 r270 bottom locked (schematic designator R4)
R45 "4K7 1%" RESC1005-STAR 2170,5185 r270 bottom locked (schematic designator R5)
R46 "4K7 1%" RESC1005-STAR 2085,5705 r180 bottom locked (schematic designator R6)
R47 "4K7 1%" RESC1005-STAR 2085,5651.67 r180 bottom locked (schematic designator R7)
R48 "49R9 1%" RESC2012-STAR 2303.31,6005 r90 bottom locked (schematic designator R8)
R49 "49R9 1%" RESC2012-STAR 2210,6005 r90 bottom locked (schematic designator R9)
R50 "4K7 1%" RESC1005-STAR 2500,5185 r90 bottom locked (schematic designator R10)
R51 "4K7 1%" RESC1005-STAR 2085,5598.33 r180 bottom locked (schematic designator R11)
R52 "4K7 1%" RESC1005-STAR 2085,5545 r180 bottom locked (schematic designator R12)
R53 "1K 1%" RESC1005-STAR 2300,5730 r0 bottom locked (schematic designator R13)
R54 "49R9 1%" RESC2012-STAR 2396.69,6005 r270 bottom locked (schematic designator R14)
R55 "49R9 1%" RESC2012-STAR 2490,6005 r270 bottom locked (schematic designator R15)
R56 "1K 1%" RESC1005-STAR 2300,5780 r180 bottom locked (schematic designator R16)
R57 "4K7 1%" RESC1005-STAR 2835,5828 r180 bottom locked (schematic designator R17)
R58 "470R 1%" RESC1005-STAR 2835,5877 r0 bottom locked (schematic designator R18)
R59 "4K7 1%" RESC1005-STAR 2635,5322.5 r0 bottom locked (schematic designator R19)
R60 "4K7 1%" RESC1005-STAR 2835,5926 r180 bottom locked (schematic designator R20)
R61 "4K7 1%" RESC1005-STAR 2835,5150 r0 bottom locked (schematic designator R21)
R62 "470R 1%" RESC1005-STAR 2835,5975 r0 bottom locked (schematic designator R22)
R63 "470R 1%" RESC1005-STAR 2835,5095 r0 bottom locked (schematic designator R23)
R64 "4K7 1%" RESC1005-STAR 2835,5730 r0 bottom locked (schematic designator R24)
R65 "4K7 1%" RESC1005-STAR 2835,5205 r0 bottom locked (schematic designator R25)
R66 "470R 1%" RESC1005-STAR 2835,5779 r180 bottom locked (schematic designator R26)
R67 "470R 1%" RESC1005-STAR 2835,5260 r0 bottom locked (schematic designator R27)
R68 "100R 1%" RESC1005-STAR 5727,3195 r180 bottom locked (schematic designator R8)
R69 "100R 1%" RESC1005-STAR 5727,3075 r180 bottom locked (schematic designator R9)
R70 "4K7 1%" RESC1005-STAR 5662.5,5085 r180 bottom locked (schematic designator R1)
R71 "100R 1%" RESC1005-STAR 5727,2955 r180 bottom locked (schematic designator R10)
R72 "100R 1%" RESC1005-STAR 5727,2835 r180 bottom locked (schematic designator R12)
R73 "4K7 1%" RESC1005-STAR 5526.06,2955 r180 bottom (schematic designator R2)
R74 "100R 1%" RESC1005-STAR 5727,2715 r180 bottom locked (schematic designator R24)
R75 "100R 1%" RESC1005-STAR 5907,2715 r180 bottom locked (schematic designator R22)
R76 "4K7 1%" RESC1005-STAR 5397.5,5085 r180 bottom locked (schematic designator R3)
R77 "4K7 1%" RESC1005-STAR 5265,5085 r180 bottom locked (schematic designator R4)
R78 "100R 1%" RESC1005-STAR 5907,3195 r180 bottom locked (schematic designator R20)
R79 "100R 1%" RESC1005-STAR 5907,3075 r180 bottom locked (schematic designator R14)
R80 "100R 1%" RESC1005-STAR 5907,2955 r180 bottom locked (schematic designator R18)
R81 "100R 1%" RESC1005-STAR 5907,2835 r180 bottom locked (schematic designator R23)
R82 "4K7 1%" RESC1005-STAR 2822.05,950 r180 bottom locked (schematic designator R1)
R83 "4K7 1%" RESC1005-STAR 3077.95,950 r180 bottom locked (schematic designator R2)
R84 "100R 1%" RESC1005-STAR 3077.95,1005 r180 bottom locked (schematic designator R3)
R85 "100R 1%" RESC1005-STAR 2822.05,1005 r180 bottom locked (schematic designator R4)
R86 "4K7 1%" RESC1005-STAR 3412.05,950 r180 bottom locked (schematic designator R1)
R87 "4K7 1%" RESC1005-STAR 3667.95,950 r180 bottom locked (schematic designator R2)
R88 "100R 1%" RESC1005-STAR 3667.95,1005 r180 bottom locked (schematic designator R3)
R89 "100R 1%" RESC1005-STAR 3412.05,1005 r180 bottom locked (schematic designator R4)
R90 "27R 1%" RESC1005-STAR 4155,5391.67 r0 top locked (schematic designator R2)
R91 "1K 1%" RESC1005-STAR 4245,5391.67 r0 top locked (schematic designator R1)
R92 "27R 1%" RESC1005-STAR 4155,5323.33 r0 top locked (schematic designator R2)
R93 "1K 1%" RESC1005-STAR 4245,5323.33 r0 top locked (schematic designator R1)
R94 "27R 1%" RESC1005-STAR 4155,5255 r0 top locked (schematic designator R2)
R95 "1K 1%" RESC1005-STAR 4245,5255 r0 top locked (schematic designator R1)
R96 "120R 1%" RESC1005-STAR 4740,5290 r270 top locked (schematic designator R1)
R97 "1K 1%" RESC1005-STAR 4760,5410 r180 top locked (schematic designator R2)
R98 "4K7 1%" RESC1005-STAR -162.5,2205 r0 bottom locked
R99 "2K2 1%" RESC1005-STAR -250,2415 r0 top locked
R100 "5R6 1%" RESC1005-STAR 6810,2825 r0 top locked
R101 "5R6 1%" RESC1005-STAR 6810,2755 r0 top locked
R102 "4K7 1%" RESC1005-STAR 5310,985 r270 top locked (schematic designator R1)
R103 "4K7 1%" RESC1005-STAR 5785,985 r270 top locked (schematic designator R2)
R104 "4K7 1%" RESC1005-STAR 6265,990 r90 top locked (schematic designator R3)
R105 "4K7 1%" RESC1005-STAR 6745,985 r270 top locked (schematic designator R4)
R106 "4K7 1%" RESC1005-STAR 7220,985 r90 top locked (schematic designator R5)
R107 "4K7 1%" RESC1005-STAR 5310,250 r90 top locked (schematic designator R1)
R108 "2K7 1%" RESC1005-STAR 7505,990 r0 bottom locked (schematic designator R2)
R109 "5K6 1%" RESC1005-STAR 7505,1045 r0 bottom locked (schematic designator R3)
R110 "10K 1%" RESC1005-STAR 7515,435 r180 bottom locked (schematic designator R4)
R111 "10M 1%" RESC3216 210,1125 r270 bottom locked (schematic designator R248)
R112 "27R 1%" RESC1005-STAR 7175,595 r0 bottom locked (schematic designator R6)
R113 "4K7 1%" RESC1005-STAR 7175,710 r180 bottom locked (schematic designator R9)
R114 "4K7 1%" RESC1005-STAR 7175,820 r180 bottom locked (schematic designator R8)
R115 "4K7 1%" RESC1005-STAR 7175,990 r180 bottom locked (schematic designator R7)
R116 "430R 1%" RESC1005-STAR 4900,5740 r0 bottom locked (schematic designator R1)
R117 "150R 1%" RESC1005-STAR 5895,6015 r0 bottom locked (schematic designator R2)
R118 "150R 1%" RESC1005-STAR 5760,6015 r0 bottom locked (schematic designator R3)
R119 "150R 1%" RESC1005-STAR 5620,6115 r180 bottom locked (schematic designator R4)
R120 "150R 1%" RESC1005-STAR 5620,6175 r0 bottom locked (schematic designator R5)
R121 "150R 1%" RESC1005-STAR 5895,6175 r180 bottom locked (schematic designator R6)
R122 "150R 1%" RESC1005-STAR 5895,6115 r180 bottom locked (schematic designator R7)
R123 "27R 1%" RESC1005-STAR 4155,5460 r0 top locked (schematic designator R2)
R124 "1K 1%" RESC1005-STAR 4245,5460 r0 top locked (schematic designator R1)
R125 "120R 1%" RESC1005-STAR 5330,5290 r270 top locked (schematic designator R1)
R126 "1K 1%" RESC1005-STAR 5350,5410 r0 top locked (schematic designator R2)
R127 "120R 1%" RESC1005-STAR 5910,5290 r270 top locked (schematic designator R1)
R128 "1K 1%" RESC1005-STAR 5935,5410 r180 top locked (schematic designator R2)
R129 "120R 1%" RESC1005-STAR 6505,5290 r270 top locked (schematic designator R1)
R130 "1K 1%" RESC1005-STAR 6525,5410 r180 top locked (schematic designator R2)
R131 "4K7 1%" RESC1005-STAR 8095,2510 r180 bottom locked (schematic designator R2)
R132 "470R 1%" RESC1005-STAR 8095,2620 r180 bottom locked (schematic designator R1)
R133 "27R 1%" RESC1005-STAR 1705.87,5260 r0 top locked (schematic designator R1)
R134 "27R 1%" RESC1005-STAR 1705.87,5415 r0 top locked (schematic designator R2)
R135 "27R 1%" RESC1005-STAR 2110.87,5415 r180 top locked (schematic designator R3)
R136 "27R 1%" RESC1005-STAR 2110.87,5260 r180 top locked (schematic designator R4)
R137 "10K 1%" RESC1005-STAR -182.03,5388.42 r180 bottom locked (schematic designator R11)
R138 "10K 1%" RESC1005-STAR -182.03,5276.75 r180 bottom locked (schematic designator R18)
R139 "1K 1%" RESC1005-STAR -182.03,5220.92 r0 bottom locked (schematic designator R16)
R140 "1K 1%" RESC1005-STAR -182.03,5110.08 r0 bottom locked (schematic designator R13)
R141 "100K 1%" RESC1005-STAR 87.97,5182.22 r0 bottom locked (schematic designator R10)
R142 "100K 1%" RESC1005-STAR 87.46,5245.8 r180 bottom locked (schematic designator R19)
R143 "1K 1%" RESC1005-STAR 87.46,5118.65 r0 bottom locked (schematic designator R21)
R144 "1K 1%" RESC1005-STAR -182.03,5332.58 r0 bottom locked (schematic designator R26)
R145 "2K2 1%" RESC1005-STAR -182.03,5165.08 r0 bottom locked (schematic designator R25)
R146 "2K2 1%" RESC1005-STAR 87.46,5309.37 r180 bottom locked (schematic designator R27)
R147 "100R 1%" RESC1005-STAR 4440,4275 r0 top locked (schematic designator R1)
R148 "4K7 1%" RESC1005-STAR 3935,4295 r0 top locked (schematic designator R1)
R149 "27R 1%" RESC1005-STAR 355,5415 r0 top locked (schematic designator R1)
R150 "27R 1%" RESC1005-STAR 1048.82,5415 r180 top locked (schematic designator R2)
R151 "27R 1%" RESC1005-STAR 1048.82,5285 r180 top locked (schematic designator R3)
R152 "27R 1%" RESC1005-STAR 355,5285 r0 top locked (schematic designator R4)
R153 "5R6 1%" RESC1005-STAR 5795,5085 r0 bottom locked (schematic designator R1_HOST)
R154 "4K7 1%" RESC1005-STAR -162.5,1910 r180 bottom locked
R155 "2K2 1%" RESC1005-STAR 7530,4055 r270 top locked (schematic designator R272)
R156 "2K2 1%" RESC1005-STAR 7530,3839.49 r270 top locked (schematic designator R273)
R157 "2K2 1%" RESC1005-STAR 7530,3698.78 r270 top locked (schematic designator R274)
R158 "2K2 1%" RESC1005-STAR 5861.06,1730 r0 bottom locked (schematic designator R1)
R159 "2K2 1%" RESC1005-STAR 7700,4850 r180 top locked (schematic designator R2)
R160 "2K2 1%" RESC1005-STAR 5861.06,1590 r0 bottom locked (schematic designator R3)
R161 "4K7 1%" RESC1005-STAR 7930,1873.33 r180 bottom locked (schematic designator R1)
R162 "4K7 1%" RESC1005-STAR 7930,1765 r180 bottom locked (schematic designator R2)
R163 "4K7 1%" RESC1005-STAR 7930,1981.67 r180 bottom locked (schematic designator R3)
R164 "150R 1%" RESC1005-STAR -325,4715 r180 top locked (schematic designator R1)
R165 "150R 1%" RESC1005-STAR -325,4603 r180 top locked (schematic designator R2)
R166 "150R 1%" RESC1005-STAR -325,4659 r180 top locked (schematic designator R3)
R167 "150R 1%" RESC1005-STAR -325,4547 r180 top locked (schematic designator R4)
R168 "150R 1%" RESC1005-STAR -325,4435 r180 top locked (schematic designator R5)
R169 "150R 1%" RESC1005-STAR -325,4491 r180 top locked (schematic designator R6)
R170 "150R 1%" RESC1005-STAR 4455,3380 r180 top locked (schematic designator R1)
R171 "150R 1%" RESC1005-STAR 4455,3265 r180 top locked (schematic designator R2)
R172 "150R 1%" RESC1005-STAR 4455,3322.5 r180 top locked (schematic designator R3)
R173 "150R 1%" RESC1005-STAR 5165,2820 r180 top locked (schematic designator R4)
R174 "150R 1%" RESC1005-STAR 5165,2695 r180 top locked (schematic designator R5)
R175 "150R 1%" RESC1005-STAR 5165,2757.5 r180 top locked (schematic designator R6)
R176 "150R 1%" RESC1005-STAR 4400,3198.75 r0 bottom locked (schematic designator R1)
R177 "150R 1%" RESC1005-STAR 4400,3085 r0 bottom locked (schematic designator R2)
R178 "150R 1%" RESC1005-STAR 4400,3141.88 r0 bottom locked (schematic designator R3)
R179 "150R 1%" RESC1005-STAR 4400,3369.38 r0 bottom locked (schematic designator R4)
R180 "150R 1%" RESC1005-STAR 4400,3255.62 r0 bottom locked (schematic designator R5)
R181 "150R 1%" RESC1005-STAR 4400,3312.5 r0 bottom locked (schematic designator R6)
R182 "150R 1%" RESC1005-STAR 4400,3540 r0 bottom locked (schematic designator R1)
R183 "150R 1%" RESC1005-STAR 4400,3426.25 r0 bottom locked (schematic designator R2)
R184 "150R 1%" RESC1005-STAR 4400,3483.12 r0 bottom locked (schematic designator R3)
R185 "150R 1%" RESC1005-STAR 4635,3198.75 r0 bottom locked (schematic designator R4)
R186 "150R 1%" RESC1005-STAR 4635,3085 r0 bottom locked (schematic designator R5)
R187 "150R 1%" RESC1005-STAR 4635,3141.88 r0 bottom locked (schematic designator R6)
R188 "150R 1%" RESC1005-STAR 4635,3369.38 r0 bottom locked (schematic designator R1)
R189 "150R 1%" RESC1005-STAR 4635,3255.62 r0 bottom locked (schematic designator R2)
R190 "150R 1%" RESC1005-STAR 4635,3312.5 r0 bottom locked (schematic designator R3)
R191 "150R 1%" RESC1005-STAR 4635,3540 r0 bottom locked (schematic designator R4)
R192 "150R 1%" RESC1005-STAR 4635,3426.25 r0 bottom locked (schematic designator R5)
R193 "150R 1%" RESC1005-STAR 4635,3483.12 r0 bottom locked (schematic designator R6)
R194 "220R 1%" RESC1005-STAR 2995,6205 r0 bottom locked (schematic designator R2)
R195 "470R 1%" RESC1005-STAR 3737.5,6155 r0 bottom locked (schematic designator R1)
R196 "27R 1%" RESC1005-STAR 3595,6155 r180 bottom locked (schematic designator R3)
R197 "220R 1%" RESC1005-STAR 3880,6155 r0 bottom locked (schematic designator R5)
R198 "120R 1%" RESC1005-STAR 3880,6010 r0 bottom locked (schematic designator R4)
R199 "220R 1%" RESC1005-STAR 4880,6160 r0 bottom locked (schematic designator R7)
R200 "120R 1%" RESC1005-STAR 4515,5900 r0 bottom locked (schematic designator R6)
R201 "120R 1%" RESC1005-STAR 2890,1625 r180 bottom locked (schematic designator R1)
R202 "56R 1%" RESC1005-STAR 3025,1625 r0 bottom locked (schematic designator R2)
R203 "120R 1%" RESC1005-STAR 1805,1625 r180 bottom locked (schematic designator R1)
R204 "120R 1%" RESC1005-STAR 1940,1625 r0 bottom locked (schematic designator R2)
R205 "120R 1%" RESC1005-STAR 720,1625 r180 bottom locked (schematic designator R1)
R206 "200R 1%" RESC1005-STAR 855,1625 r0 bottom locked (schematic designator R2)
R207 "0R 5%" RESC1005-STAR 3325,1635 r180 bottom locked (schematic designator R1)
R208 "10K 1%" RESC1005-STAR 3460,1635 r0 bottom locked (schematic designator R2)
R209 "100R 1%" RESC1005-STAR 517.11,5565.08 r0 bottom locked (schematic designator R1)
R210 "100R 1%" RESC1005-STAR 517.11,5420.08 r0 bottom locked (schematic designator R2)
R211 "100R 1%" RESC1005-STAR 1840,5670 r180 bottom locked (schematic designator R1)
R212 "120R 1%" RESC1005-STAR 1430,5500 r90 bottom locked (schematic designator R2)
R214 "120R 1%" RESC1005-STAR 6810,2615 r0 top locked
R215 "47K 1%" RESC1005-STAR 6810,2685 r0 top locked (schematic designator R2)
R216 "4K7 1%" RESC1005-STAR 3250,3030 r0 bottom locked (schematic designator R1)
R217 "4K7 1%" RESC1005-STAR 3250,2957.5 r0 bottom locked (schematic designator R2)
R218 "4K7 1%" RESC1005-STAR 3250,2740 r0 bottom locked (schematic designator R3)
R219 "4K7 1%" RESC1005-STAR 3250,2885 r0 bottom locked (schematic designator R4)
R220 "100R 1%" RESC1005-STAR 3125,3030 r180 bottom locked (schematic designator R5)
R221 "100R 1%" RESC1005-STAR 3125,2957.5 r180 bottom locked (schematic designator R6)
R222 "100R 1%" RESC1005-STAR 3125,2740 r180 bottom locked (schematic designator R7)
R223 "100R 1%" RESC1005-STAR 3125,2885 r180 bottom locked (schematic designator R8)
R224 "4K7 1%" RESC1005-STAR 3250,2812.5 r0 bottom locked (schematic designator R9)
R225 "4K7 1%" RESC1005-STAR 3250,2667.5 r0 bottom locked (schematic designator R10)
R226 "4K7 1%" RESC1005-STAR 3250,2522.5 r180 bottom locked (schematic designator R11)
R227 "4K7 1%" RESC1005-STAR 3250,2595 r0 bottom locked (schematic designator R12)